# Altium PCB Briac_Charger.PcbDoc (part 3 of 4)
Units mm, origin at the board's own origin, x right, y up, seen from the top; angles counter-clockwise.
Board outline 70.05 x 79.98 mm, 2 copper layers (Top Layer, Bottom Layer), stack 1.448 mm thick; 114 components, 62 nets, 335 pads, 3733 vias.
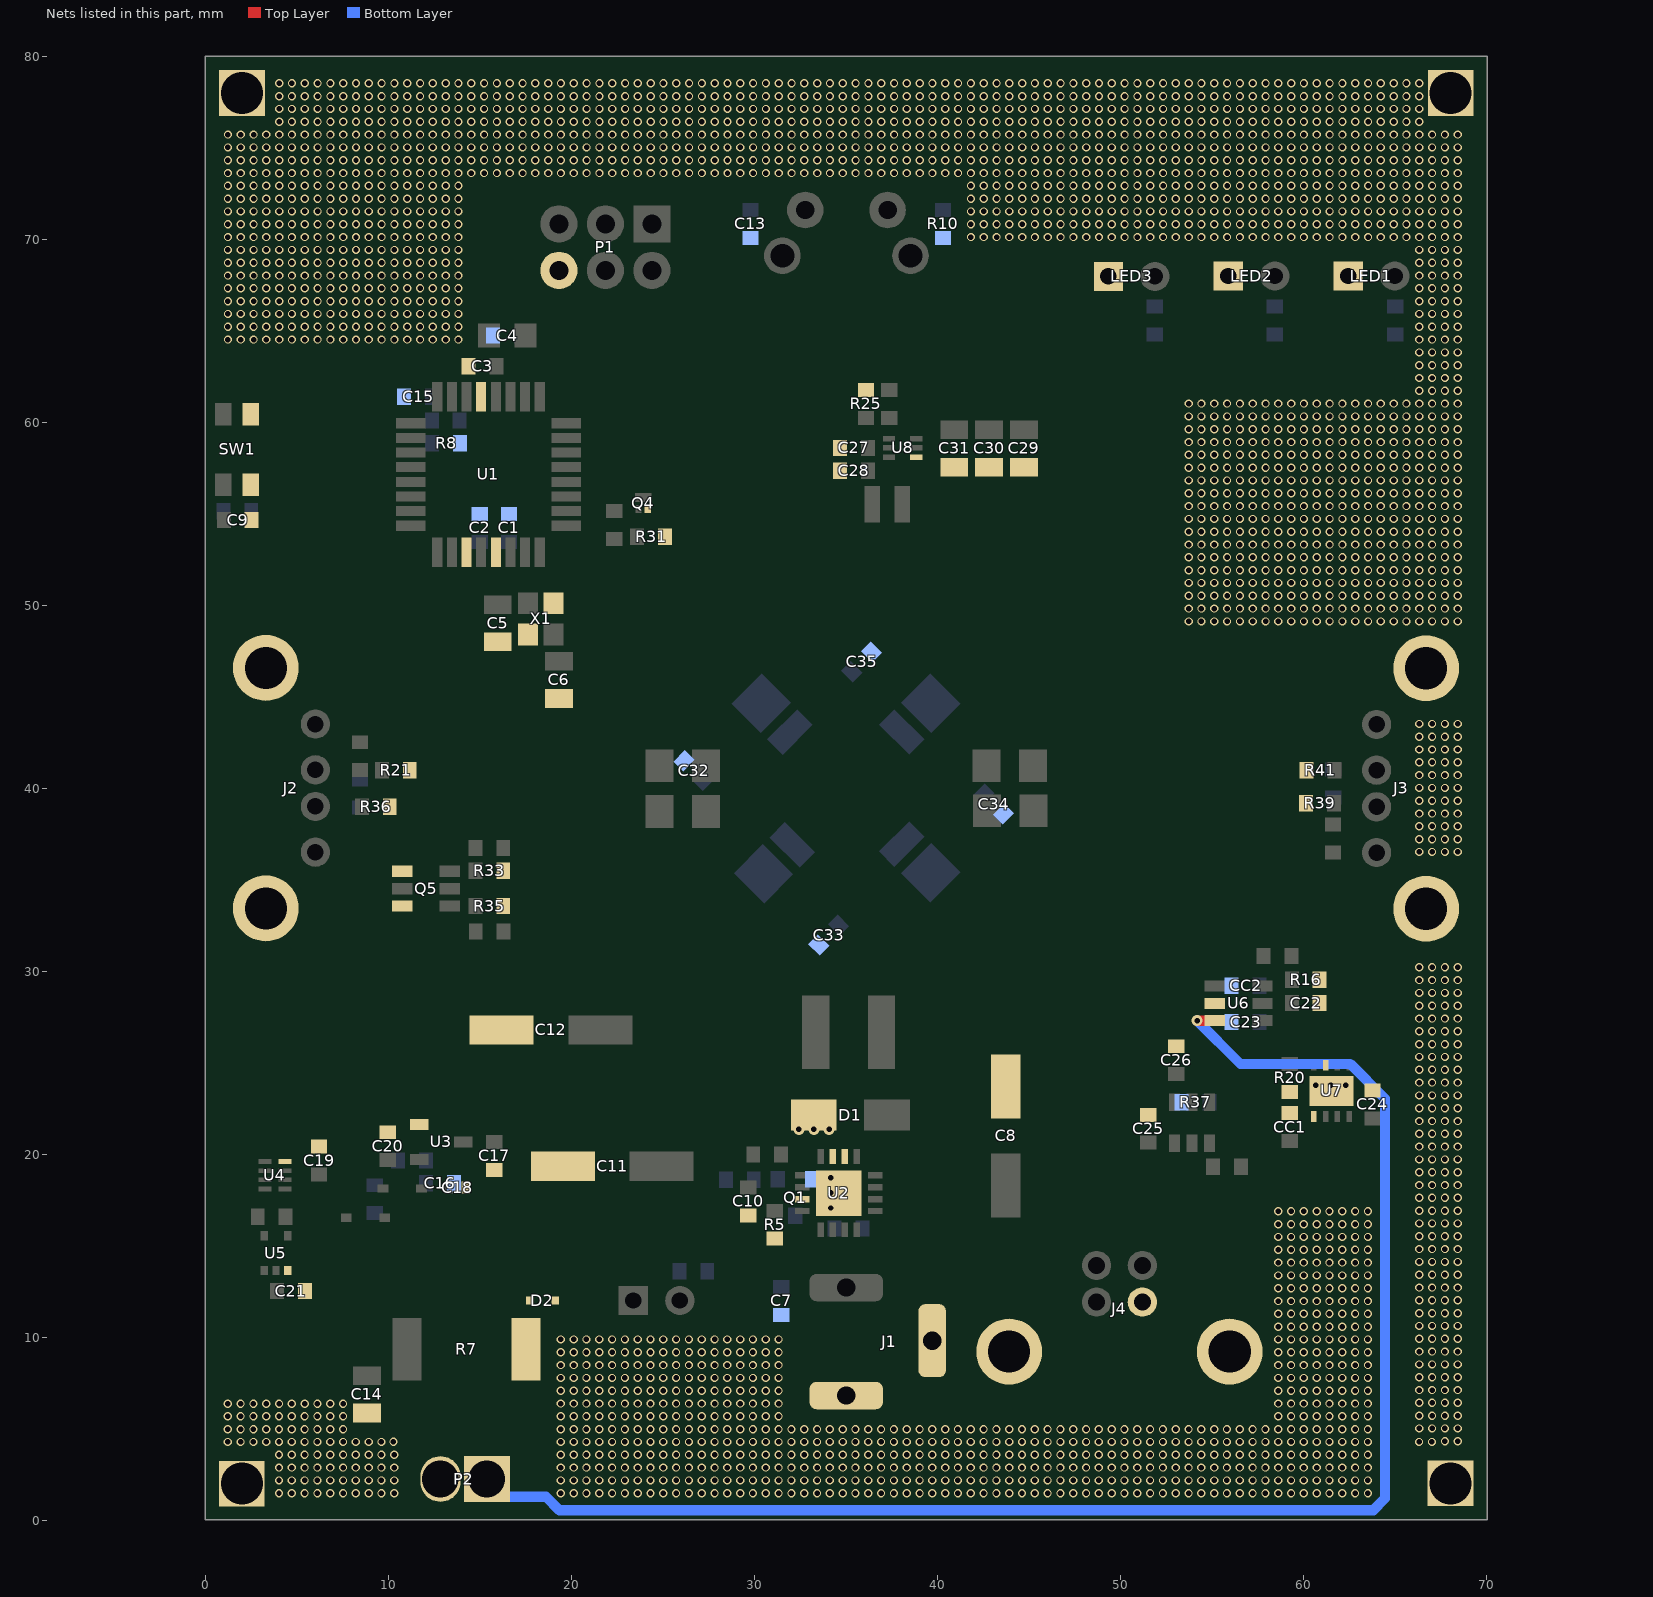
[diagram p2: the nets of this part, all layers, seen from the top]

## Via types
v1: diameter 0.45, hole 0.3, Top Layer to Bottom Layer, 2562 vias
v2: diameter 0.45, hole 0.3, Top Layer to Bottom Layer, tented both sides, 1106 vias
v3: diameter 0.6, hole 0.3, Top Layer to Bottom Layer, tented both sides, 65 vias

## Nets (pads, with @x,y where several pads share a name; then routed paths per layer and width w, separated by ;. In a path a pad name is that pad's centre, name@x,y a point inside that pad or via, vN(x,y) a via of type N, cw(c..) or ccw(c..) an arc to the next point about the centre after c; other vN are vias at no path point) (continued)
GND: C1.2 C2.2 C3.1 C4.1 C5.1 C6.1 C7.2 C8.2 C9.2 C10.1 C11.2 C12.1 C13.2 C14.2 C15.2 C16.2 C17.1 C18.2 C19.1 C20.2 C21.2 C22.2 C23.2 C24.2 C25.2 C26.1 C27.2 C28.2 C29.2 C30.2 C31.2 C32.2 C33.2 C34.2 C35.2 CC1.2 CC2.2 D1.1 D2.1 J1.2 J1.3 J2.MH1 J2.MH2 J3.MH1 J3.MH2 J4.4 J4.MH1 J4.MH2 LED1.1 LED2.1 LED3.1 P1.6 P2.2 pad.MH1 pad.MH2 pad.MH3 pad.MH4 Q1.2 Q4.2 Q5.1 Q5.3 R5.2 R8.2 R10.2 R16.1 R20.1 R21.1 R25.2 R31.2 R33.2 R35.2 R36.1 R37.1 R39.1 R41.1 SW1.2 U1.3 U1.5 U1.21 U2.6 U2.7 U2.11 U2.17 U3.1 U4.8 U5.3 U6.2 U7.3 U7.5 U7.9 U8.4 X1.2 X1.4
  other v1: 4.031,1.485 4.731,1.485 5.431,1.485 6.131,1.485 6.831,1.485 7.531,1.485 8.231,1.485 8.931,1.485 9.631,1.485 10.331,1.485 19.431,1.485 20.131,1.485 20.831,1.485 21.531,1.485 22.231,1.485 22.931,1.485 23.631,1.485 24.331,1.485 25.031,1.485 25.731,1.485 26.431,1.485 27.131,1.485 27.831,1.485 28.531,1.485 29.231,1.485 29.931,1.485 30.631,1.485 31.331,1.485 32.031,1.485 32.731,1.485 33.431,1.485 34.131,1.485 34.831,1.485 35.531,1.485 36.231,1.485 36.931,1.485 37.631,1.485 38.331,1.485 39.031,1.485 39.731,1.485 40.431,1.485 41.131,1.485 41.831,1.485 42.531,1.485 43.231,1.485 43.931,1.485 44.631,1.485 45.331,1.485 46.031,1.485 46.731,1.485 47.431,1.485 48.131,1.485 48.831,1.485 49.531,1.485 50.231,1.485 50.931,1.485 51.631,1.485 52.331,1.485 53.031,1.485 53.731,1.485 54.431,1.485 55.131,1.485 55.831,1.485 56.531,1.485 57.231,1.485 57.931,1.485 58.631,1.485 59.331,1.485 60.031,1.485 60.731,1.485 61.431,1.485 62.131,1.485 62.831,1.485 63.531,1.485 4.031,2.185 4.731,2.185 5.431,2.185 6.131,2.185 6.831,2.185 7.531,2.185 8.231,2.185 8.931,2.185 9.631,2.185 10.331,2.185 19.431,2.185 20.131,2.185 20.831,2.185 21.531,2.185 22.231,2.185 22.931,2.185 23.631,2.185 24.331,2.185 25.031,2.185 25.731,2.185 26.431,2.185 27.131,2.185 27.831,2.185 28.531,2.185 29.231,2.185 29.931,2.185 30.631,2.185 31.331,2.185 32.031,2.185 32.731,2.185 33.431,2.185 34.131,2.185 34.831,2.185 35.531,2.185 36.231,2.185 36.931,2.185 37.631,2.185 38.331,2.185 39.031,2.185 39.731,2.185 40.431,2.185 41.131,2.185 41.831,2.185 42.531,2.185 43.231,2.185 43.931,2.185 44.631,2.185 45.331,2.185 46.031,2.185 46.731,2.185 47.431,2.185 48.131,2.185 48.831,2.185 49.531,2.185 50.231,2.185 50.931,2.185 51.631,2.185 52.331,2.185 53.031,2.185 53.731,2.185 54.431,2.185 55.131,2.185 55.831,2.185 56.531,2.185 57.231,2.185 57.931,2.185 58.631,2.185 59.331,2.185 60.031,2.185 60.731,2.185 61.431,2.185 62.131,2.185 62.831,2.185 63.531,2.185 4.031,2.885 4.731,2.885 5.431,2.885 6.131,2.885 6.831,2.885 7.531,2.885 8.231,2.885 8.931,2.885 9.631,2.885 10.331,2.885 19.431,2.885 20.131,2.885 20.831,2.885 21.531,2.885 22.231,2.885 22.931,2.885 23.631,2.885 24.331,2.885 25.031,2.885 25.731,2.885 26.431,2.885 27.131,2.885 27.831,2.885 28.531,2.885 29.231,2.885 29.931,2.885 30.631,2.885 31.331,2.885 32.031,2.885 32.731,2.885 33.431,2.885 34.131,2.885 34.831,2.885 35.531,2.885 36.231,2.885 36.931,2.885 37.631,2.885 38.331,2.885 39.031,2.885 39.731,2.885 40.431,2.885 41.131,2.885 41.831,2.885 42.531,2.885 43.231,2.885 43.931,2.885 44.631,2.885 45.331,2.885 46.031,2.885 46.731,2.885 47.431,2.885 48.131,2.885 48.831,2.885 49.531,2.885 50.231,2.885 50.931,2.885 51.631,2.885 52.331,2.885 53.031,2.885 53.731,2.885 54.431,2.885 55.131,2.885 55.831,2.885 56.531,2.885 57.231,2.885 57.931,2.885 58.631,2.885 59.331,2.885 60.031,2.885 60.731,2.885 61.431,2.885 62.131,2.885 62.831,2.885 63.531,2.885 4.031,3.585 4.731,3.585 5.431,3.585 6.131,3.585 6.831,3.585 7.531,3.585 8.231,3.585 8.931,3.585 9.631,3.585 10.331,3.585 19.431,3.585 20.131,3.585 20.831,3.585 21.531,3.585 22.231,3.585 22.931,3.585 23.631,3.585 24.331,3.585 25.031,3.585 25.731,3.585 26.431,3.585 27.131,3.585 27.831,3.585 28.531,3.585 29.231,3.585 29.931,3.585 30.631,3.585 31.331,3.585 32.031,3.585 32.731,3.585 33.431,3.585 34.131,3.585 34.831,3.585 35.531,3.585 36.231,3.585 36.931,3.585 37.631,3.585 38.331,3.585 39.031,3.585 39.731,3.585 40.431,3.585 41.131,3.585 41.831,3.585 42.531,3.585 43.231,3.585 43.931,3.585 44.631,3.585 45.331,3.585 46.031,3.585 46.731,3.585 47.431,3.585 48.131,3.585 48.831,3.585 49.531,3.585 50.231,3.585 50.931,3.585 51.631,3.585 52.331,3.585 53.031,3.585 53.731,3.585 54.431,3.585 55.131,3.585 55.831,3.585 56.531,3.585 57.231,3.585 57.931,3.585 58.631,3.585 59.331,3.585 60.031,3.585 60.731,3.585 61.431,3.585 62.131,3.585 62.831,3.585 63.531,3.585 1.231,4.285 1.931,4.285 2.631,4.285 3.331,4.285 4.031,4.285 4.731,4.285 5.431,4.285 6.131,4.285 6.831,4.285 7.531,4.285 8.231,4.285 8.931,4.285 9.631,4.285 10.287,4.293 19.431,4.285 20.131,4.285 20.831,4.285 21.531,4.285 22.231,4.285 22.931,4.285 23.631,4.285 24.331,4.285 25.031,4.285 25.731,4.285 26.431,4.285 27.131,4.285 27.831,4.285 28.531,4.285 29.231,4.285 29.931,4.285 30.631,4.285 31.331,4.285 32.031,4.285 32.731,4.285 33.431,4.285 34.131,4.285 34.831,4.285 35.531,4.285 36.231,4.285 36.931,4.285 37.631,4.285 38.331,4.285 39.031,4.285 39.731,4.285 40.431,4.285 41.131,4.285 41.831,4.285 42.531,4.285 43.231,4.285 43.931,4.285 44.631,4.285 45.331,4.285 46.031,4.285 46.731,4.285 47.431,4.285 48.131,4.285 48.831,4.285 49.531,4.285 50.231,4.285 50.931,4.285 51.631,4.285 52.331,4.285 53.031,4.285 53.731,4.285 54.431,4.285 55.131,4.285 55.831,4.285 56.531,4.285 57.231,4.285 57.931,4.285 58.631,4.285 59.331,4.285 60.031,4.285 60.731,4.285 61.431,4.285 62.131,4.285 62.831,4.285 63.531,4.285 66.331,4.285 67.031,4.285 67.739,4.323 68.439,4.323 1.231,4.985 1.931,4.985 2.631,4.985 3.331,4.985 4.031,4.985 4.731,4.985 5.431,4.985 6.131,4.985 6.831,4.985 7.531,4.985 19.431,4.985 20.131,4.985 20.831,4.985 21.531,4.985 22.231,4.985 22.931,4.985 23.631,4.985 24.331,4.985 25.031,4.985 25.731,4.985 26.431,4.985 27.131,4.985 27.831,4.985 28.531,4.985 29.231,4.985 29.931,4.985 30.631,4.985 31.331,4.985 32.031,4.985 32.731,4.985 33.431,4.985 34.131,4.985 34.831,4.985 35.531,4.985 36.231,4.985 36.931,4.985 37.631,4.985 38.331,4.985 39.031,4.985 39.731,4.985 40.431,4.985 41.131,4.985 41.831,4.985 42.531,4.985 43.231,4.985 43.931,4.985 44.631,4.985 45.331,4.985 46.031,4.985 46.731,4.985 47.431,4.985 48.131,4.985 48.831,4.985 49.531,4.985 50.231,4.985 50.931,4.985 51.631,4.985 52.331,4.985 53.031,4.985 53.731,4.985 54.431,4.985 55.131,4.985 55.831,4.985 56.531,4.985 57.231,4.985 57.931,4.985 58.631,4.985 59.331,4.985 60.031,4.985 60.731,4.985 61.431,4.985 62.131,4.985 62.831,4.985 63.531,4.985 66.339,5.023 67.039,5.023 67.739,5.023 68.439,5.023 1.231,5.685 1.931,5.685 2.631,5.685 3.331,5.685 4.031,5.685 4.731,5.685 5.431,5.685 6.131,5.685 6.831,5.685 7.531,5.685 19.431,5.685 20.131,5.685 20.831,5.685 21.531,5.685 22.231,5.685 22.931,5.685 23.631,5.685 24.331,5.685 25.031,5.685 25.731,5.685 26.431,5.685 27.131,5.685 27.831,5.685 28.531,5.685 29.231,5.685 29.931,5.685 30.631,5.685 31.331,5.685 58.631,5.685 59.331,5.685 60.031,5.685 60.731,5.685 61.431,5.685 62.131,5.685 62.831,5.685 63.531,5.685 66.339,5.723 67.039,5.723 67.739,5.723 68.439,5.723 1.233,6.375 1.933,6.375 2.633,6.375 3.333,6.375 4.033,6.375 4.733,6.375 5.433,6.375 6.133,6.375 6.833,6.375 7.533,6.375 19.431,6.385 20.131,6.385 20.831,6.385 21.531,6.385 22.231,6.385 22.931,6.385 23.631,6.385 24.331,6.385 25.031,6.385 25.731,6.385 26.431,6.385 27.131,6.385 27.831,6.385 28.531,6.385 29.231,6.385 29.931,6.385 30.631,6.385 31.331,6.385 58.631,6.385 59.331,6.385 60.031,6.385 60.731,6.385 61.431,6.385 62.131,6.385 62.831,6.385 63.531,6.385 66.339,6.423 67.039,6.423 67.739,6.423 68.439,6.423 19.431,7.085 20.131,7.085 20.831,7.085 21.531,7.085 22.231,7.085 22.931,7.085 23.631,7.085 24.331,7.085 25.031,7.085 25.731,7.085 26.431,7.085 27.131,7.085 27.831,7.085 28.531,7.085 29.231,7.085 29.931,7.085 30.631,7.085 31.331,7.085 58.631,7.085 59.331,7.085 60.031,7.085 60.731,7.085 61.431,7.085 62.131,7.085 62.831,7.085 63.531,7.085 66.339,7.123 67.039,7.123 67.739,7.123 68.439,7.123 19.431,7.785 20.131,7.785 20.831,7.785 21.531,7.785 22.231,7.785 22.931,7.785 23.631,7.785 24.331,7.785 25.031,7.785 25.731,7.785 26.431,7.785 27.131,7.785 27.831,7.785 28.531,7.785 29.231,7.785 29.931,7.785 30.631,7.785 31.331,7.785 58.631,7.785 59.331,7.785 60.031,7.785 60.731,7.785 61.431,7.785 62.131,7.785 62.831,7.785 63.531,7.785 66.339,7.823 67.039,7.823 67.739,7.823 68.439,7.823 19.431,8.485 20.131,8.485 20.831,8.485 21.531,8.485 22.231,8.485 22.931,8.485 23.631,8.485 24.331,8.485 25.031,8.485 25.731,8.485 26.431,8.485 27.131,8.485 27.831,8.485 28.531,8.485 29.231,8.485 29.931,8.485 30.631,8.485 31.331,8.485 58.631,8.485 59.331,8.485 60.031,8.485 60.731,8.485 61.431,8.485 62.131,8.485 62.831,8.485 63.531,8.485 66.339,8.523 67.039,8.523 67.739,8.523 68.439,8.523 19.431,9.185 20.131,9.185 20.831,9.185 21.531,9.185 22.231,9.185 22.931,9.185 23.631,9.185 24.331,9.185 25.031,9.185 25.731,9.185 26.431,9.185 27.131,9.185 27.831,9.185 28.531,9.185 29.231,9.185 29.931,9.185 30.631,9.185 31.331,9.185 58.631,9.185 59.331,9.185 60.031,9.185 60.731,9.185 61.431,9.185 62.131,9.185 62.831,9.185 63.531,9.185 66.339,9.223 67.039,9.223 67.739,9.223 68.439,9.223 19.431,9.885 20.131,9.885 20.831,9.885 21.531,9.885 22.231,9.885 22.931,9.885 23.631,9.885 24.331,9.885 25.031,9.885 25.731,9.885 26.431,9.885 27.131,9.885 27.831,9.885 28.531,9.885 29.231,9.885 29.931,9.885 30.631,9.885 31.331,9.885 58.631,9.885 59.331,9.885 60.031,9.885 60.731,9.885 61.431,9.885 62.131,9.885 62.831,9.885 63.531,9.885 66.339,9.923 67.039,9.923 67.739,9.923 68.439,9.923 58.631,10.585 59.331,10.585 60.031,10.585 60.731,10.585 61.431,10.585 62.131,10.585 62.831,10.585 63.531,10.585 66.339,10.623 67.039,10.623 67.739,10.623 68.439,10.623 58.631,11.285 59.331,11.285 60.031,11.285 60.731,11.285 61.431,11.285 62.131,11.285 62.831,11.285 63.531,11.285 66.339,11.323 67.039,11.323 67.739,11.323 68.439,11.323 58.631,11.985 59.331,11.985 60.031,11.985 60.731,11.985 61.431,11.985 62.131,11.985 62.831,11.985 63.531,11.985 66.339,12.023 67.039,12.023 67.739,12.023 68.439,12.023 58.631,12.685 59.331,12.685 60.031,12.685 60.731,12.685 61.431,12.685 62.131,12.685 62.831,12.685 63.531,12.685 66.339,12.723 67.039,12.723 67.739,12.723 68.439,12.723 58.631,13.385 59.331,13.385 60.031,13.385 60.731,13.385 61.431,13.385 62.131,13.385 62.831,13.385 63.531,13.385 66.339,13.423 67.039,13.423 67.739,13.423 68.439,13.423 58.631,14.085 59.331,14.085 60.031,14.085 60.731,14.085 61.431,14.085 62.131,14.085 62.831,14.085 63.531,14.085 66.339,14.123 67.039,14.123 67.739,14.123 68.439,14.123 58.631,14.785 59.331,14.785 60.031,14.785 60.731,14.785 61.431,14.785 62.131,14.785 62.831,14.785 63.531,14.785 66.339,14.823 67.039,14.823 67.739,14.823 68.439,14.823 58.631,15.485 59.331,15.485 60.031,15.485 60.731,15.485 61.431,15.485 62.131,15.485 62.831,15.485 63.531,15.485 66.339,15.523 67.039,15.523 67.739,15.523 68.439,15.523 58.631,16.185 59.331,16.185 60.031,16.185 60.731,16.185 61.431,16.185 62.131,16.185 62.831,16.185 63.531,16.185 66.339,16.223 67.039,16.223 67.739,16.223 68.439,16.223 58.631,16.885 59.331,16.885 60.031,16.885 60.731,16.885 61.431,16.885 62.131,16.885 62.831,16.885 63.531,16.885 66.339,16.923 67.039,16.923 67.739,16.923 68.439,16.923 66.339,17.623 67.039,17.623 67.739,17.623 68.439,17.623 66.339,18.323 67.039,18.323 67.739,18.323 68.439,18.323 66.339,19.023 67.039,19.023 67.739,19.023 68.439,19.023 66.339,19.723 67.039,19.723 67.739,19.723 68.439,19.723 66.339,20.423 67.039,20.423 67.739,20.423 68.439,20.423 66.339,21.123 67.039,21.123 67.739,21.123 68.439,21.123 66.339,21.823 67.039,21.823 67.739,21.823 68.439,21.823 66.339,22.523 67.039,22.523 67.739,22.523 68.439,22.523 66.339,23.223 67.039,23.223 67.739,23.223 68.439,23.223 66.339,23.923 67.039,23.923 67.739,23.923 68.439,23.923 66.339,24.623 67.039,24.623 67.739,24.623 68.439,24.623 66.339,25.323 67.039,25.323 67.739,25.323 68.439,25.323 66.339,26.023 67.039,26.023 67.739,26.023 68.439,26.023 66.339,26.723 67.039,26.723 67.739,26.723 68.439,26.723 66.339,27.423 67.039,27.423 67.739,27.423 68.439,27.423 66.339,28.123 67.039,28.123 67.739,28.123 68.439,28.123 66.339,28.823 67.039,28.823 67.739,28.823 68.439,28.823 66.339,29.523 67.039,29.523 67.739,29.523 68.439,29.523 66.339,30.223 67.039,30.223 67.739,30.223 68.439,30.223 66.339,36.523 67.039,36.523 67.739,36.523 68.439,36.523 66.339,37.223 67.039,37.223 67.739,37.223 68.439,37.223 66.339,37.923 67.039,37.923 67.739,37.923 68.439,37.923 66.339,38.623 67.039,38.623 67.739,38.623 68.439,38.623 66.339,39.323 67.039,39.323 67.739,39.323 68.439,39.323 66.339,40.023 67.039,40.023 67.739,40.023 68.439,40.023 66.339,40.723 67.039,40.723 67.739,40.723 68.439,40.723 66.339,41.423 67.039,41.423 67.739,41.423 68.439,41.423 66.339,42.123 67.039,42.123 67.739,42.123 68.439,42.123 66.339,42.823 67.039,42.823 67.739,42.823 68.439,42.823 66.339,43.523 67.039,43.523 67.739,43.523 68.439,43.523 53.739,49.123 54.439,49.123 55.139,49.123 55.839,49.123 56.539,49.123 57.239,49.123 57.939,49.123 58.639,49.123 59.339,49.123 60.039,49.123 60.739,49.123 61.439,49.123 62.139,49.123 62.839,49.123 63.539,49.123 64.239,49.123 64.939,49.123 65.639,49.123 66.339,49.123 67.039,49.123 67.739,49.123 68.439,49.123 53.739,49.823 54.439,49.823 55.139,49.823 55.839,49.823 56.539,49.823 57.239,49.823 57.939,49.823 58.639,49.823 59.339,49.823 60.039,49.823 60.739,49.823 61.439,49.823 62.139,49.823 62.839,49.823 63.539,49.823 64.239,49.823 64.939,49.823 65.639,49.823 66.339,49.823 67.039,49.823 67.739,49.823 68.439,49.823 53.739,50.523 54.439,50.523 55.139,50.523 55.839,50.523 56.539,50.523 57.239,50.523 57.939,50.523 58.639,50.523 59.339,50.523 60.039,50.523 60.739,50.523 61.439,50.523 62.139,50.523 62.839,50.523 63.539,50.523 64.239,50.523 64.939,50.523 65.639,50.523 66.339,50.523 67.039,50.523 67.739,50.523 68.439,50.523 53.739,51.223 54.439,51.223 55.139,51.223 55.839,51.223 56.539,51.223 57.239,51.223 57.939,51.223 58.639,51.223 59.339,51.223 60.039,51.223 60.739,51.223 61.439,51.223 62.139,51.223 62.839,51.223 63.539,51.223 64.239,51.223 64.939,51.223 65.639,51.223 66.339,51.223 67.039,51.223 67.739,51.223 68.439,51.223 53.739,51.923 54.439,51.923 55.139,51.923 55.839,51.923 56.539,51.923 57.239,51.923 57.939,51.923 58.639,51.923 59.339,51.923 60.039,51.923 60.739,51.923 61.439,51.923 62.139,51.923 62.839,51.923 63.539,51.923 64.239,51.923 64.939,51.923 65.639,51.923 66.339,51.923 67.039,51.923 67.739,51.923 68.439,51.923 53.739,52.623 54.439,52.623 55.139,52.623 55.839,52.623 56.539,52.623 57.239,52.623 57.939,52.623 58.639,52.623 59.339,52.623 60.039,52.623 60.739,52.623 61.439,52.623 62.139,52.623 62.839,52.623 63.539,52.623 64.239,52.623 64.939,52.623 65.639,52.623 66.339,52.623 67.039,52.623 67.739,52.623 68.439,52.623 53.739,53.323 54.439,53.323 55.139,53.323 55.839,53.323 56.539,53.323 57.239,53.323 57.939,53.323 58.639,53.323 59.339,53.323 60.039,53.323 60.739,53.323 61.439,53.323 62.139,53.323 62.839,53.323 63.539,53.323 64.239,53.323 64.939,53.323 65.639,53.323 66.339,53.323 67.039,53.323 67.739,53.323 68.439,53.323 53.739,54.023 54.439,54.023 55.139,54.023 55.839,54.023 56.539,54.023 57.239,54.023 57.939,54.023 58.639,54.023 59.339,54.023 60.039,54.023 60.739,54.023 61.439,54.023 62.139,54.023 62.839,54.023 63.539,54.023 64.239,54.023 64.939,54.023 65.639,54.023 66.339,54.023 67.039,54.023 67.739,54.023 68.439,54.023 53.739,54.723 54.439,54.723 55.139,54.723 55.839,54.723 56.539,54.723 57.239,54.723 57.939,54.723 58.639,54.723 59.339,54.723 60.039,54.723 60.739,54.723 61.439,54.723 62.139,54.723 62.839,54.723 63.539,54.723 64.239,54.723 64.939,54.723 65.639,54.723 66.339,54.723 67.039,54.723 67.739,54.723 68.439,54.723 53.739,55.423 54.439,55.423 55.139,55.423 55.839,55.423 56.539,55.423 57.239,55.423 57.939,55.423 58.639,55.423 59.339,55.423 60.039,55.423 60.739,55.423 61.439,55.423 62.139,55.423 62.839,55.423 63.539,55.423 64.239,55.423 64.939,55.423 65.639,55.423 66.339,55.423 67.039,55.423 67.739,55.423 68.439,55.423 53.739,56.123 54.439,56.123 55.139,56.123 55.839,56.123 56.539,56.123 57.239,56.123 57.939,56.123 58.639,56.123 59.339,56.123 60.039,56.123 60.739,56.123 61.439,56.123 62.139,56.123 62.839,56.123 63.539,56.123 64.239,56.123 64.939,56.123 65.639,56.123 66.339,56.123 67.039,56.123 67.739,56.123 68.439,56.123 53.739,56.823 54.439,56.823 55.139,56.823 55.839,56.823 56.539,56.823 57.239,56.823 57.939,56.823 58.639,56.823 59.339,56.823 60.039,56.823 60.739,56.823 61.439,56.823 62.139,56.823 62.839,56.823 63.539,56.823 64.239,56.823 64.939,56.823 65.639,56.823 66.339,56.823 67.039,56.823 67.739,56.823 68.439,56.823 53.739,57.523 54.439,57.523 55.139,57.523 55.839,57.523 56.539,57.523 57.239,57.523 57.939,57.523 58.639,57.523 59.339,57.523 60.039,57.523 60.739,57.523 61.439,57.523 62.139,57.523 62.839,57.523 63.539,57.523 64.239,57.523 64.939,57.523 65.639,57.523 66.339,57.523 67.039,57.523 67.739,57.523 68.439,57.523 53.739,58.223 54.439,58.223 55.139,58.223 55.839,58.223 56.539,58.223 57.239,58.223 57.939,58.223 58.639,58.223 59.339,58.223 60.039,58.223 60.739,58.223 61.439,58.223 62.139,58.223 62.839,58.223 63.539,58.223 64.239,58.223 64.939,58.223 65.639,58.223 66.339,58.223 67.039,58.223 67.739,58.223 68.439,58.223 53.739,58.923 54.439,58.923 55.139,58.923 55.839,58.923 56.539,58.923 57.239,58.923 57.939,58.923 58.639,58.923 59.339,58.923 60.039,58.923 60.739,58.923 61.439,58.923 62.139,58.923 62.839,58.923 63.539,58.923 64.239,58.923 64.939,58.923 65.639,58.923 66.339,58.923 67.039,58.923 67.739,58.923 68.439,58.923 53.739,59.623 54.439,59.623 55.139,59.623 55.839,59.623 56.539,59.623 57.239,59.623 57.939,59.623 58.639,59.623 59.339,59.623 60.039,59.623 60.739,59.623 61.439,59.623 62.139,59.623 62.839,59.623 63.539,59.623 64.239,59.623 64.939,59.623 65.639,59.623 66.339,59.623 67.039,59.623 67.739,59.623 68.439,59.623 53.739,60.323 54.439,60.323 55.139,60.323 55.839,60.323 56.539,60.323 57.239,60.323 57.939,60.323 58.639,60.323 59.339,60.323 60.039,60.323 60.739,60.323 61.439,60.323 62.139,60.323 62.839,60.323 63.539,60.323 64.239,60.323 64.939,60.323 65.639,60.323 66.339,60.323 67.039,60.323 67.739,60.323 68.439,60.323 53.739,61.023 54.439,61.023 55.139,61.023 55.839,61.023 56.539,61.023 57.239,61.023 57.939,61.023 58.639,61.023 59.339,61.023 60.039,61.023 60.739,61.023 61.439,61.023 62.139,61.023 62.839,61.023 63.539,61.023 64.239,61.023 64.939,61.023 65.639,61.023 66.339,61.023 67.039,61.023 67.739,61.023 68.439,61.023 66.339,61.723 67.039,61.723 67.739,61.723 68.439,61.723 66.339,62.423 67.039,62.423 67.739,62.423 68.439,62.423 66.339,63.123 67.039,63.123 67.739,63.123 68.439,63.123 66.339,63.823 67.039,63.823 67.739,63.823 68.439,63.823 1.239,64.523 1.939,64.523 2.639,64.523 3.339,64.523 4.039,64.523 4.739,64.523 5.439,64.523 6.139,64.523 6.839,64.523 7.539,64.523 8.239,64.523 8.939,64.523 9.639,64.523 10.339,64.523 11.039,64.523 11.739,64.523 12.439,64.523 13.139,64.523 13.839,64.523 66.339,64.523 67.039,64.523 67.739,64.523 68.439,64.523 1.239,65.223 1.939,65.223 2.639,65.223 3.339,65.223 4.039,65.223 4.739,65.223 5.439,65.223 6.139,65.223 6.839,65.223 7.539,65.223 8.239,65.223 8.939,65.223 9.639,65.223 10.339,65.223 11.039,65.223 11.739,65.223 12.439,65.223 13.139,65.223 13.839,65.223 66.339,65.223 67.039,65.223 67.739,65.223 68.439,65.223 1.239,65.923 1.939,65.923 2.639,65.923 3.339,65.923 4.039,65.923 4.739,65.923 5.439,65.923 6.139,65.923 6.839,65.923 7.539,65.923 8.239,65.923 8.939,65.923 9.639,65.923 10.339,65.923 11.039,65.923 11.739,65.923 12.439,65.923 13.139,65.923 13.839,65.923 66.339,65.923 67.039,65.923 67.739,65.923 68.439,65.923 1.239,66.623 1.939,66.623 2.639,66.623 3.339,66.623 4.039,66.623 4.739,66.623 5.439,66.623 6.139,66.623 6.839,66.623 7.539,66.623 8.239,66.623 8.939,66.623 9.639,66.623 10.339,66.623 11.039,66.623 11.739,66.623 12.439,66.623 13.139,66.623 13.839,66.623 66.339,66.623 67.039,66.623 67.739,66.623 68.439,66.623 1.239,67.323 1.939,67.323 2.639,67.323 3.339,67.323 4.039,67.323 4.739,67.323 5.439,67.323 6.139,67.323 6.839,67.323 7.539,67.323 8.239,67.323 8.939,67.323 9.639,67.323 10.339,67.323 11.039,67.323 11.739,67.323 12.439,67.323 13.139,67.323 13.839,67.323 66.339,67.323 67.039,67.323 67.739,67.323 68.439,67.323 1.239,68.023 1.939,68.023 2.639,68.023 3.339,68.023 4.039,68.023 4.739,68.023 5.439,68.023 6.139,68.023 6.839,68.023 7.539,68.023 8.239,68.023 8.939,68.023 9.639,68.023 10.339,68.023 11.039,68.023 11.739,68.023 12.439,68.023 12.439,68.023 13.139,68.023 13.839,68.023 66.339,68.023 67.039,68.023 67.739,68.023 68.439,68.023 1.239,68.723 1.939,68.723 2.639,68.723 3.339,68.723 4.039,68.723 4.739,68.723 5.439,68.723 6.139,68.723 6.839,68.723 7.539,68.723 8.239,68.723 8.939,68.723 9.639,68.723 10.339,68.723 11.039,68.723 11.739,68.723 12.439,68.723 13.139,68.723 13.839,68.723 66.339,68.723 67.039,68.723 67.739,68.723 68.439,68.723 1.239,69.423 1.939,69.423 2.639,69.423 3.339,69.423 4.039,69.423 4.739,69.423 5.439,69.423 6.139,69.423 6.839,69.423 7.539,69.423 8.239,69.423 8.939,69.423 9.639,69.423 10.339,69.423 11.039,69.423 11.739,69.423 12.439,69.423 13.139,69.423 13.839,69.423 66.339,69.423 67.039,69.423 67.739,69.423 68.439,69.423 1.239,70.123 1.939,70.123 2.639,70.123 3.339,70.123 4.039,70.123 4.739,70.123 5.439,70.123 6.139,70.123 6.839,70.123 7.539,70.123 8.239,70.123 8.939,70.123 9.639,70.123 10.339,70.123 11.039,70.123 11.739,70.123 12.439,70.123 13.139,70.123 13.839,70.123 41.839,70.123 42.539,70.123 43.239,70.123 43.939,70.123 44.639,70.123 45.339,70.123 46.039,70.123 46.739,70.123 47.439,70.123 48.139,70.123 48.839,70.123 49.539,70.123 50.239,70.123 50.939,70.123 51.639,70.123 52.339,70.123 53.039,70.123 53.739,70.123 54.439,70.123 55.139,70.123 55.839,70.123 56.539,70.123 57.239,70.123 57.939,70.123 58.639,70.123 59.339,70.123 60.039,70.123 60.739,70.123 61.439,70.123 62.139,70.123 62.839,70.123 63.539,70.123 64.239,70.123 64.939,70.123 65.639,70.123 66.339,70.123 67.039,70.123 67.739,70.123 68.439,70.123 1.239,70.823 1.939,70.823 2.639,70.823 3.339,70.823 4.039,70.823 4.739,70.823 5.439,70.823 6.139,70.823 6.839,70.823 7.539,70.823 8.239,70.823 8.939,70.823 9.639,70.823 10.339,70.823 11.039,70.823 11.739,70.823 12.439,70.823 13.139,70.823 13.839,70.823 41.839,70.823 42.539,70.823 43.239,70.823 43.939,70.823 44.639,70.823 45.339,70.823 46.039,70.823 46.739,70.823 47.439,70.823 48.139,70.823 48.839,70.823 49.539,70.823 50.239,70.823 50.939,70.823 51.639,70.823 52.339,70.823 53.039,70.823 53.739,70.823 54.439,70.823 55.139,70.823 55.839,70.823 56.539,70.823 57.239,70.823 57.939,70.823 58.639,70.823 59.339,70.823 60.039,70.823 60.739,70.823 61.439,70.823 62.139,70.823 62.839,70.823 63.539,70.823 64.239,70.823 64.939,70.823 65.639,70.823 66.339,70.823 67.039,70.823 67.739,70.823 68.439,70.823 1.239,71.523 1.939,71.523 2.639,71.523 3.339,71.523 4.039,71.523 4.739,71.523 5.439,71.523 6.139,71.523 6.839,71.523 7.539,71.523 8.239,71.523 8.939,71.523 9.639,71.523 10.339,71.523 11.039,71.523 11.739,71.523 12.439,71.523 13.139,71.523 13.839,71.523 41.839,71.523 42.539,71.523 43.239,71.523 43.939,71.523 44.639,71.523 45.339,71.523 46.039,71.523 46.739,71.523 47.439,71.523 48.139,71.523 48.839,71.523 49.539,71.523 50.239,71.523 50.939,71.523 51.639,71.523 52.339,71.523 53.039,71.523 53.739,71.523 54.439,71.523 55.139,71.523 55.839,71.523 56.539,71.523 57.239,71.523 57.939,71.523 58.639,71.523 59.339,71.523 60.039,71.523 60.739,71.523 61.439,71.523 62.139,71.523 62.839,71.523 63.539,71.523 64.239,71.523 64.939,71.523 65.639,71.523 66.339,71.523 67.039,71.523 67.739,71.523 68.439,71.523 1.239,72.223 1.939,72.223 2.639,72.223 3.339,72.223 4.039,72.223 4.739,72.223 5.439,72.223 6.139,72.223 6.839,72.223 7.539,72.223 8.239,72.223 8.939,72.223 9.639,72.223 10.339,72.223 11.039,72.223 11.739,72.223 12.439,72.223 13.139,72.223 13.839,72.223 41.839,72.223 42.539,72.223 43.239,72.223 43.939,72.223 44.639,72.223 45.339,72.223 46.039,72.223 46.739,72.223 47.439,72.223 48.139,72.223 48.839,72.223 49.539,72.223 50.239,72.223 50.939,72.223 51.639,72.223 52.339,72.223 53.039,72.223 53.739,72.223 54.439,72.223 55.139,72.223 55.839,72.223 56.539,72.223 57.239,72.223 57.939,72.223 58.639,72.223 59.339,72.223 60.039,72.223 60.739,72.223 61.439,72.223 62.139,72.223 62.839,72.223 63.539,72.223 64.239,72.223 64.939,72.223 65.639,72.223 66.339,72.223 67.039,72.223 67.739,72.223 68.439,72.223 1.239,72.923 1.939,72.923 2.639,72.923 3.339,72.923 4.039,72.923 4.739,72.923 5.439,72.923 6.139,72.923 6.839,72.923 7.539,72.923 8.239,72.923 8.939,72.923 9.639,72.923 10.339,72.923 11.039,72.923 11.739,72.923 12.439,72.923 13.139,72.923 13.839,72.923 41.839,72.923 42.539,72.923 43.239,72.923 43.939,72.923 44.639,72.923 45.339,72.923 46.039,72.923 46.739,72.923 47.439,72.923 48.139,72.923 48.839,72.923 49.539,72.923 50.239,72.923 50.939,72.923 51.639,72.923 52.339,72.923 53.039,72.923 53.739,72.923 54.439,72.923 55.139,72.923 55.839,72.923 56.539,72.923 57.239,72.923 57.939,72.923 58.639,72.923 59.339,72.923 60.039,72.923 60.739,72.923 61.439,72.923 62.139,72.923 62.839,72.923 63.539,72.923 64.239,72.923 64.939,72.923 65.639,72.923 66.339,72.923 67.039,72.923 67.739,72.923 68.439,72.923 4.039,73.609 1.239,73.623 1.939,73.623 2.639,73.623 3.339,73.623 4.739,73.623 5.439,73.623 6.139,73.623 6.839,73.623 7.539,73.623 8.239,73.623 8.939,73.623 9.639,73.623 10.339,73.623 11.039,73.623 11.739,73.623 12.439,73.623 13.139,73.623 13.839,73.623 14.539,73.623 15.239,73.623 15.939,73.623 16.639,73.623 17.339,73.623 18.039,73.623 18.739,73.623 19.439,73.623 20.139,73.623 20.839,73.623 21.539,73.623 22.239,73.623 22.939,73.623 23.639,73.623 24.339,73.623 25.039,73.623 25.739,73.623 26.439,73.623 27.139,73.623 27.839,73.623 28.539,73.623 29.239,73.623 29.939,73.623 30.639,73.623 31.339,73.623 32.039,73.623 32.739,73.623 33.439,73.623 34.139,73.623 34.839,73.623 35.539,73.623 36.239,73.623 36.939,73.623 37.639,73.623 38.339,73.623 39.039,73.623 39.739,73.623 40.439,73.623 41.139,73.623 41.839,73.623 42.539,73.623 43.239,73.623 43.939,73.623 44.639,73.623 45.339,73.623 46.039,73.623 46.739,73.623 47.439,73.623 48.139,73.623 48.839,73.623 49.539,73.623 50.239,73.623 50.939,73.623 51.639,73.623 51.639,73.623 52.339,73.623 53.039,73.623 53.739,73.623 54.439,73.623 55.139,73.623 55.839,73.623 56.539,73.623 57.239,73.623 57.939,73.623 58.639,73.623 59.339,73.623 60.039,73.623 60.739,73.623 61.439,73.623 62.139,73.623 62.839,73.623 63.539,73.623 64.239,73.623 64.939,73.623 65.639,73.623 66.339,73.623 67.039,73.623 67.739,73.623 68.439,73.623 1.239,74.323 1.939,74.323 2.639,74.323 3.339,74.323 4.039,74.323 4.739,74.323 5.439,74.323 6.139,74.323 6.839,74.323 7.539,74.323 8.239,74.323 8.939,74.323 9.639,74.323 10.339,74.323 11.039,74.323 11.739,74.323 12.439,74.323 13.139,74.323 13.839,74.323 14.539,74.323 15.239,74.323 15.939,74.323 16.639,74.323 17.339,74.323 18.039,74.323 18.739,74.323 19.439,74.323 20.139,74.323 20.839,74.323 21.539,74.323 22.239,74.323 22.939,74.323 23.639,74.323 24.339,74.323 25.039,74.323 25.739,74.323 26.439,74.323 27.139,74.323 27.839,74.323 28.539,74.323 29.239,74.323 29.939,74.323 30.639,74.323 31.339,74.323 32.039,74.323 32.739,74.323 33.439,74.323 34.139,74.323 34.839,74.323 35.539,74.323 36.239,74.323 36.939,74.323 37.639,74.323 38.339,74.323 39.039,74.323 39.739,74.323 40.439,74.323 41.139,74.323 41.839,74.323 42.539,74.323 43.239,74.323 43.939,74.323 44.639,74.323 45.339,74.323 46.039,74.323 46.739,74.323 47.439,74.323 48.139,74.323 48.839,74.323 49.539,74.323 50.239,74.323 50.939,74.323 51.639,74.323 52.339,74.323 53.039,74.323 53.739,74.323 54.439,74.323 55.139,74.323 55.839,74.323 56.539,74.323 57.239,74.323 57.939,74.323 58.639,74.323 59.339,74.323 60.039,74.323 60.739,74.323 61.439,74.323 62.139,74.323 62.839,74.323 63.539,74.323 64.239,74.323 64.939,74.323 65.639,74.323 66.339,74.323 67.039,74.323 67.739,74.323 68.439,74.323 1.239,75.023 1.939,75.023 2.639,75.023 3.339,75.023 4.039,75.023 4.739,75.023 5.439,75.023 6.139,75.023 6.839,75.023 7.539,75.023 8.239,75.023 8.939,75.023 9.639,75.023 10.339,75.023 11.039,75.023 11.739,75.023 12.439,75.023 13.139,75.023 13.839,75.023 14.539,75.023 15.239,75.023 15.939,75.023 16.639,75.023 17.339,75.023 18.039,75.023 18.739,75.023 19.439,75.023 20.139,75.023 20.839,75.023 21.539,75.023 22.239,75.023 22.939,75.023 23.639,75.023 24.339,75.023 25.039,75.023 25.739,75.023 26.439,75.023 27.139,75.023 27.839,75.023 28.539,75.023 29.239,75.023 29.939,75.023 30.639,75.023 31.339,75.023 32.039,75.023 32.739,75.023 33.439,75.023 34.139,75.023 34.839,75.023 35.539,75.023 36.239,75.023 36.939,75.023 37.639,75.023 38.339,75.023 39.039,75.023 39.739,75.023 40.439,75.023 41.139,75.023 41.839,75.023 42.539,75.023 43.239,75.023 43.939,75.023 44.639,75.023 45.339,75.023 46.039,75.023 46.739,75.023 47.439,75.023 48.139,75.023 48.839,75.023 49.539,75.023 50.239,75.023 50.939,75.023 51.639,75.023 52.339,75.023 53.039,75.023 53.739,75.023 54.439,75.023 55.139,75.023 55.839,75.023 56.539,75.023 57.239,75.023 57.939,75.023 58.639,75.023 59.339,75.023 60.039,75.023 60.739,75.023 61.439,75.023 62.139,75.023 62.839,75.023 63.539,75.023 64.239,75.023 64.939,75.023 65.639,75.023 66.339,75.023 67.039,75.023 67.739,75.023 68.439,75.023 1.239,75.723 1.939,75.723 2.639,75.723 3.339,75.723 4.039,75.723 4.739,75.723 5.439,75.723 6.139,75.723 6.839,75.723 7.539,75.723 8.239,75.723 8.939,75.723 9.639,75.723 10.339,75.723 11.039,75.723 11.739,75.723 12.439,75.723 13.139,75.723 13.839,75.723 14.539,75.723 15.239,75.723 15.939,75.723 16.639,75.723 17.339,75.723 18.039,75.723 18.739,75.723 19.439,75.723 20.139,75.723 20.839,75.723 21.539,75.723 22.239,75.723 22.939,75.723 23.639,75.723 24.339,75.723 25.039,75.723 25.739,75.723 26.439,75.723 27.139,75.723 27.839,75.723 28.539,75.723 29.239,75.723 29.939,75.723 30.639,75.723 31.339,75.723 32.039,75.723 32.739,75.723 33.439,75.723 34.139,75.723 34.839,75.723 35.539,75.723 36.239,75.723 36.939,75.723 37.639,75.723 38.339,75.723 39.039,75.723 39.739,75.723 40.439,75.723 41.139,75.723 41.839,75.723 42.539,75.723 43.239,75.723 43.939,75.723 44.639,75.723 45.339,75.723 46.039,75.723 46.739,75.723 47.439,75.723 48.139,75.723 48.839,75.723 49.539,75.723 50.239,75.723 50.939,75.723 51.639,75.723 52.339,75.723 53.039,75.723 53.739,75.723 54.439,75.723 55.139,75.723 55.839,75.723 56.539,75.723 57.239,75.723 57.939,75.723 58.639,75.723 59.339,75.723 60.039,75.723 60.739,75.723 61.439,75.723 62.139,75.723 62.839,75.723 63.539,75.723 64.239,75.723 64.939,75.723 65.639,75.723 66.339,75.723 67.039,75.723 67.739,75.723 68.439,75.723 4.039,76.423 4.739,76.423 5.439,76.423 6.139,76.423 6.839,76.423 7.539,76.423 8.239,76.423 8.939,76.423 9.639,76.423 10.339,76.423 11.039,76.423 11.739,76.423 12.439,76.423 13.139,76.423 13.839,76.423 14.539,76.423 15.239,76.423 15.939,76.423 16.639,76.423 17.339,76.423 18.039,76.423 18.739,76.423 19.439,76.423 20.139,76.423 20.839,76.423 21.539,76.423 22.239,76.423 22.939,76.423 23.639,76.423 24.339,76.423 25.039,76.423 25.739,76.423 26.439,76.423 27.139,76.423 27.839,76.423 28.539,76.423 29.239,76.423 29.939,76.423 30.639,76.423 31.339,76.423 32.039,76.423 32.739,76.423 33.439,76.423 34.139,76.423 34.839,76.423 35.539,76.423 36.239,76.423 36.939,76.423 37.639,76.423 38.339,76.423 39.039,76.423 39.739,76.423 40.439,76.423 41.139,76.423 41.839,76.423 42.539,76.423 43.239,76.423 43.939,76.423 44.639,76.423 45.339,76.423 46.039,76.423 46.739,76.423 47.439,76.423 48.139,76.423 48.839,76.423 49.539,76.423 50.239,76.423 50.939,76.423 51.639,76.423 52.339,76.423 53.039,76.423 53.739,76.423 54.439,76.423 55.139,76.423 55.839,76.423 56.539,76.423 57.239,76.423 57.939,76.423 58.639,76.423 59.339,76.423 60.039,76.423 60.739,76.423 61.439,76.423 62.139,76.423 62.839,76.423 63.539,76.423 64.239,76.423 64.939,76.423 65.639,76.423 66.339,76.423 4.039,77.123 4.739,77.123 5.439,77.123 6.139,77.123 6.839,77.123 7.539,77.123 8.239,77.123 8.939,77.123 9.639,77.123 10.339,77.123 11.039,77.123 11.739,77.123 12.439,77.123 13.139,77.123 13.839,77.123 14.539,77.123 15.239,77.123 15.939,77.123 16.639,77.123 17.339,77.123 18.039,77.123 18.739,77.123 19.439,77.123 20.139,77.123 20.839,77.123 21.539,77.123 22.239,77.123 22.939,77.123 23.639,77.123 24.339,77.123 25.039,77.123 25.739,77.123 26.439,77.123 27.139,77.123 27.839,77.123 28.539,77.123 29.239,77.123 29.939,77.123 30.639,77.123 31.339,77.123 32.039,77.123 32.739,77.123 33.439,77.123 34.139,77.123 34.839,77.123 35.539,77.123 36.239,77.123 36.939,77.123 37.639,77.123 38.339,77.123 39.039,77.123 39.739,77.123 40.439,77.123 41.139,77.123 41.839,77.123 42.539,77.123 43.239,77.123 43.939,77.123 44.639,77.123 45.339,77.123 46.039,77.123 46.739,77.123 47.439,77.123 48.139,77.123 48.839,77.123 49.539,77.123 50.239,77.123 50.939,77.123 51.639,77.123 52.339,77.123 53.039,77.123 53.739,77.123 54.439,77.123 55.139,77.123 55.839,77.123 56.539,77.123 57.239,77.123 57.939,77.123 58.639,77.123 59.339,77.123 60.039,77.123 60.739,77.123 61.439,77.123 62.139,77.123 62.839,77.123 63.539,77.123 64.239,77.123 64.939,77.123 65.639,77.123 66.339,77.123 4.039,77.823 4.739,77.823 5.439,77.823 6.139,77.823 6.839,77.823 7.539,77.823 8.239,77.823 8.939,77.823 9.639,77.823 10.339,77.823 11.039,77.823 11.739,77.823 12.439,77.823 13.139,77.823 13.839,77.823 14.539,77.823 15.239,77.823 15.939,77.823 16.639,77.823 17.339,77.823 18.039,77.823 18.739,77.823 19.439,77.823 20.139,77.823 20.839,77.823 21.539,77.823 22.239,77.823 22.939,77.823 23.639,77.823 24.339,77.823 25.039,77.823 25.739,77.823 26.439,77.823 27.139,77.823 27.839,77.823 28.539,77.823 29.239,77.823 29.939,77.823 30.639,77.823 31.339,77.823 32.039,77.823 32.739,77.823 33.439,77.823 34.139,77.823 34.839,77.823 35.539,77.823 36.239,77.823 36.939,77.823 37.639,77.823 38.339,77.823 39.039,77.823 39.739,77.823 40.439,77.823 41.139,77.823 41.839,77.823 42.539,77.823 43.239,77.823 43.939,77.823 44.639,77.823 45.339,77.823 46.039,77.823 46.739,77.823 47.439,77.823 48.139,77.823 48.839,77.823 49.539,77.823 50.239,77.823 50.939,77.823 51.639,77.823 52.339,77.823 53.039,77.823 53.739,77.823 54.439,77.823 55.139,77.823 55.839,77.823 56.539,77.823 57.239,77.823 57.939,77.823 58.639,77.823 59.339,77.823 60.039,77.823 60.739,77.823 61.439,77.823 62.139,77.823 62.839,77.823 63.539,77.823 64.239,77.823 64.939,77.823 65.639,77.823 66.339,77.823 4.039,78.523 4.739,78.523 5.439,78.523 6.139,78.523 6.839,78.523 7.539,78.523 8.239,78.523 8.939,78.523 9.639,78.523 10.339,78.523 11.039,78.523 11.739,78.523 12.439,78.523 13.139,78.523 13.839,78.523 14.539,78.523 15.239,78.523 15.939,78.523 16.639,78.523 17.339,78.523 18.039,78.523 18.739,78.523 19.439,78.523 20.139,78.523 20.839,78.523 21.539,78.523 22.239,78.523 22.939,78.523 23.639,78.523 24.339,78.523 25.039,78.523 25.739,78.523 26.439,78.523 27.139,78.523 27.839,78.523 28.539,78.523 29.239,78.523 29.939,78.523 30.639,78.523 31.339,78.523 32.039,78.523 32.739,78.523 33.439,78.523 34.139,78.523 34.839,78.523 35.539,78.523 36.239,78.523 36.939,78.523 37.639,78.523 38.339,78.523 39.039,78.523 39.739,78.523 40.439,78.523 41.139,78.523 41.839,78.523 42.539,78.523 43.239,78.523 43.939,78.523 44.639,78.523 45.339,78.523 46.039,78.523 46.739,78.523 47.439,78.523 48.139,78.523 48.839,78.523 49.539,78.523 50.239,78.523 50.939,78.523 51.639,78.523 52.339,78.523 53.039,78.523 53.739,78.523 54.439,78.523 55.139,78.523 55.839,78.523 56.539,78.523 57.239,78.523 57.939,78.523 58.639,78.523 59.339,78.523 60.039,78.523 60.739,78.523 61.439,78.523 62.139,78.523 62.839,78.523 63.539,78.523 64.239,78.523 64.939,78.523 65.639,78.523 66.339,78.523
  other v3: 34.188,17.069 34.188,17.894 34.188,18.72 32.436,21.361 33.261,21.361 34.087,21.361 60.681,23.774 61.506,23.774 62.332,23.774
IN: D2.2 P2.1 R7.1 U6.3 | length 83.5
  Top Layer w0.559: v3(54.204,27.305) U6.3@55.164,27.305
  Bottom Layer w0.559: P2.1@16.363,1.29 18.624,1.29 19.355,0.559 63.821,0.559 64.465,1.203 64.465,23.038 62.56,24.943 56.584,24.943 ; v3@54.242,27.284 54.235,27.284 54.215,27.305 v3(54.204,27.305) 56.545,24.963